# Altium PCB Copy of IoT_SYNTHPATCH.PcbDoc (part 1 of 2)
Units mm, origin at the board's own origin, x right, y up, seen from the top; angles counter-clockwise.
Board outline 99 x 108 mm, 4 copper layers (Top Layer, PWR, GND, Bottom Layer), stack 1.587 mm thick; 354 components, 216 nets, 1040 pads, 0 vias.
Unrouted connection lines stored in the file: 706.
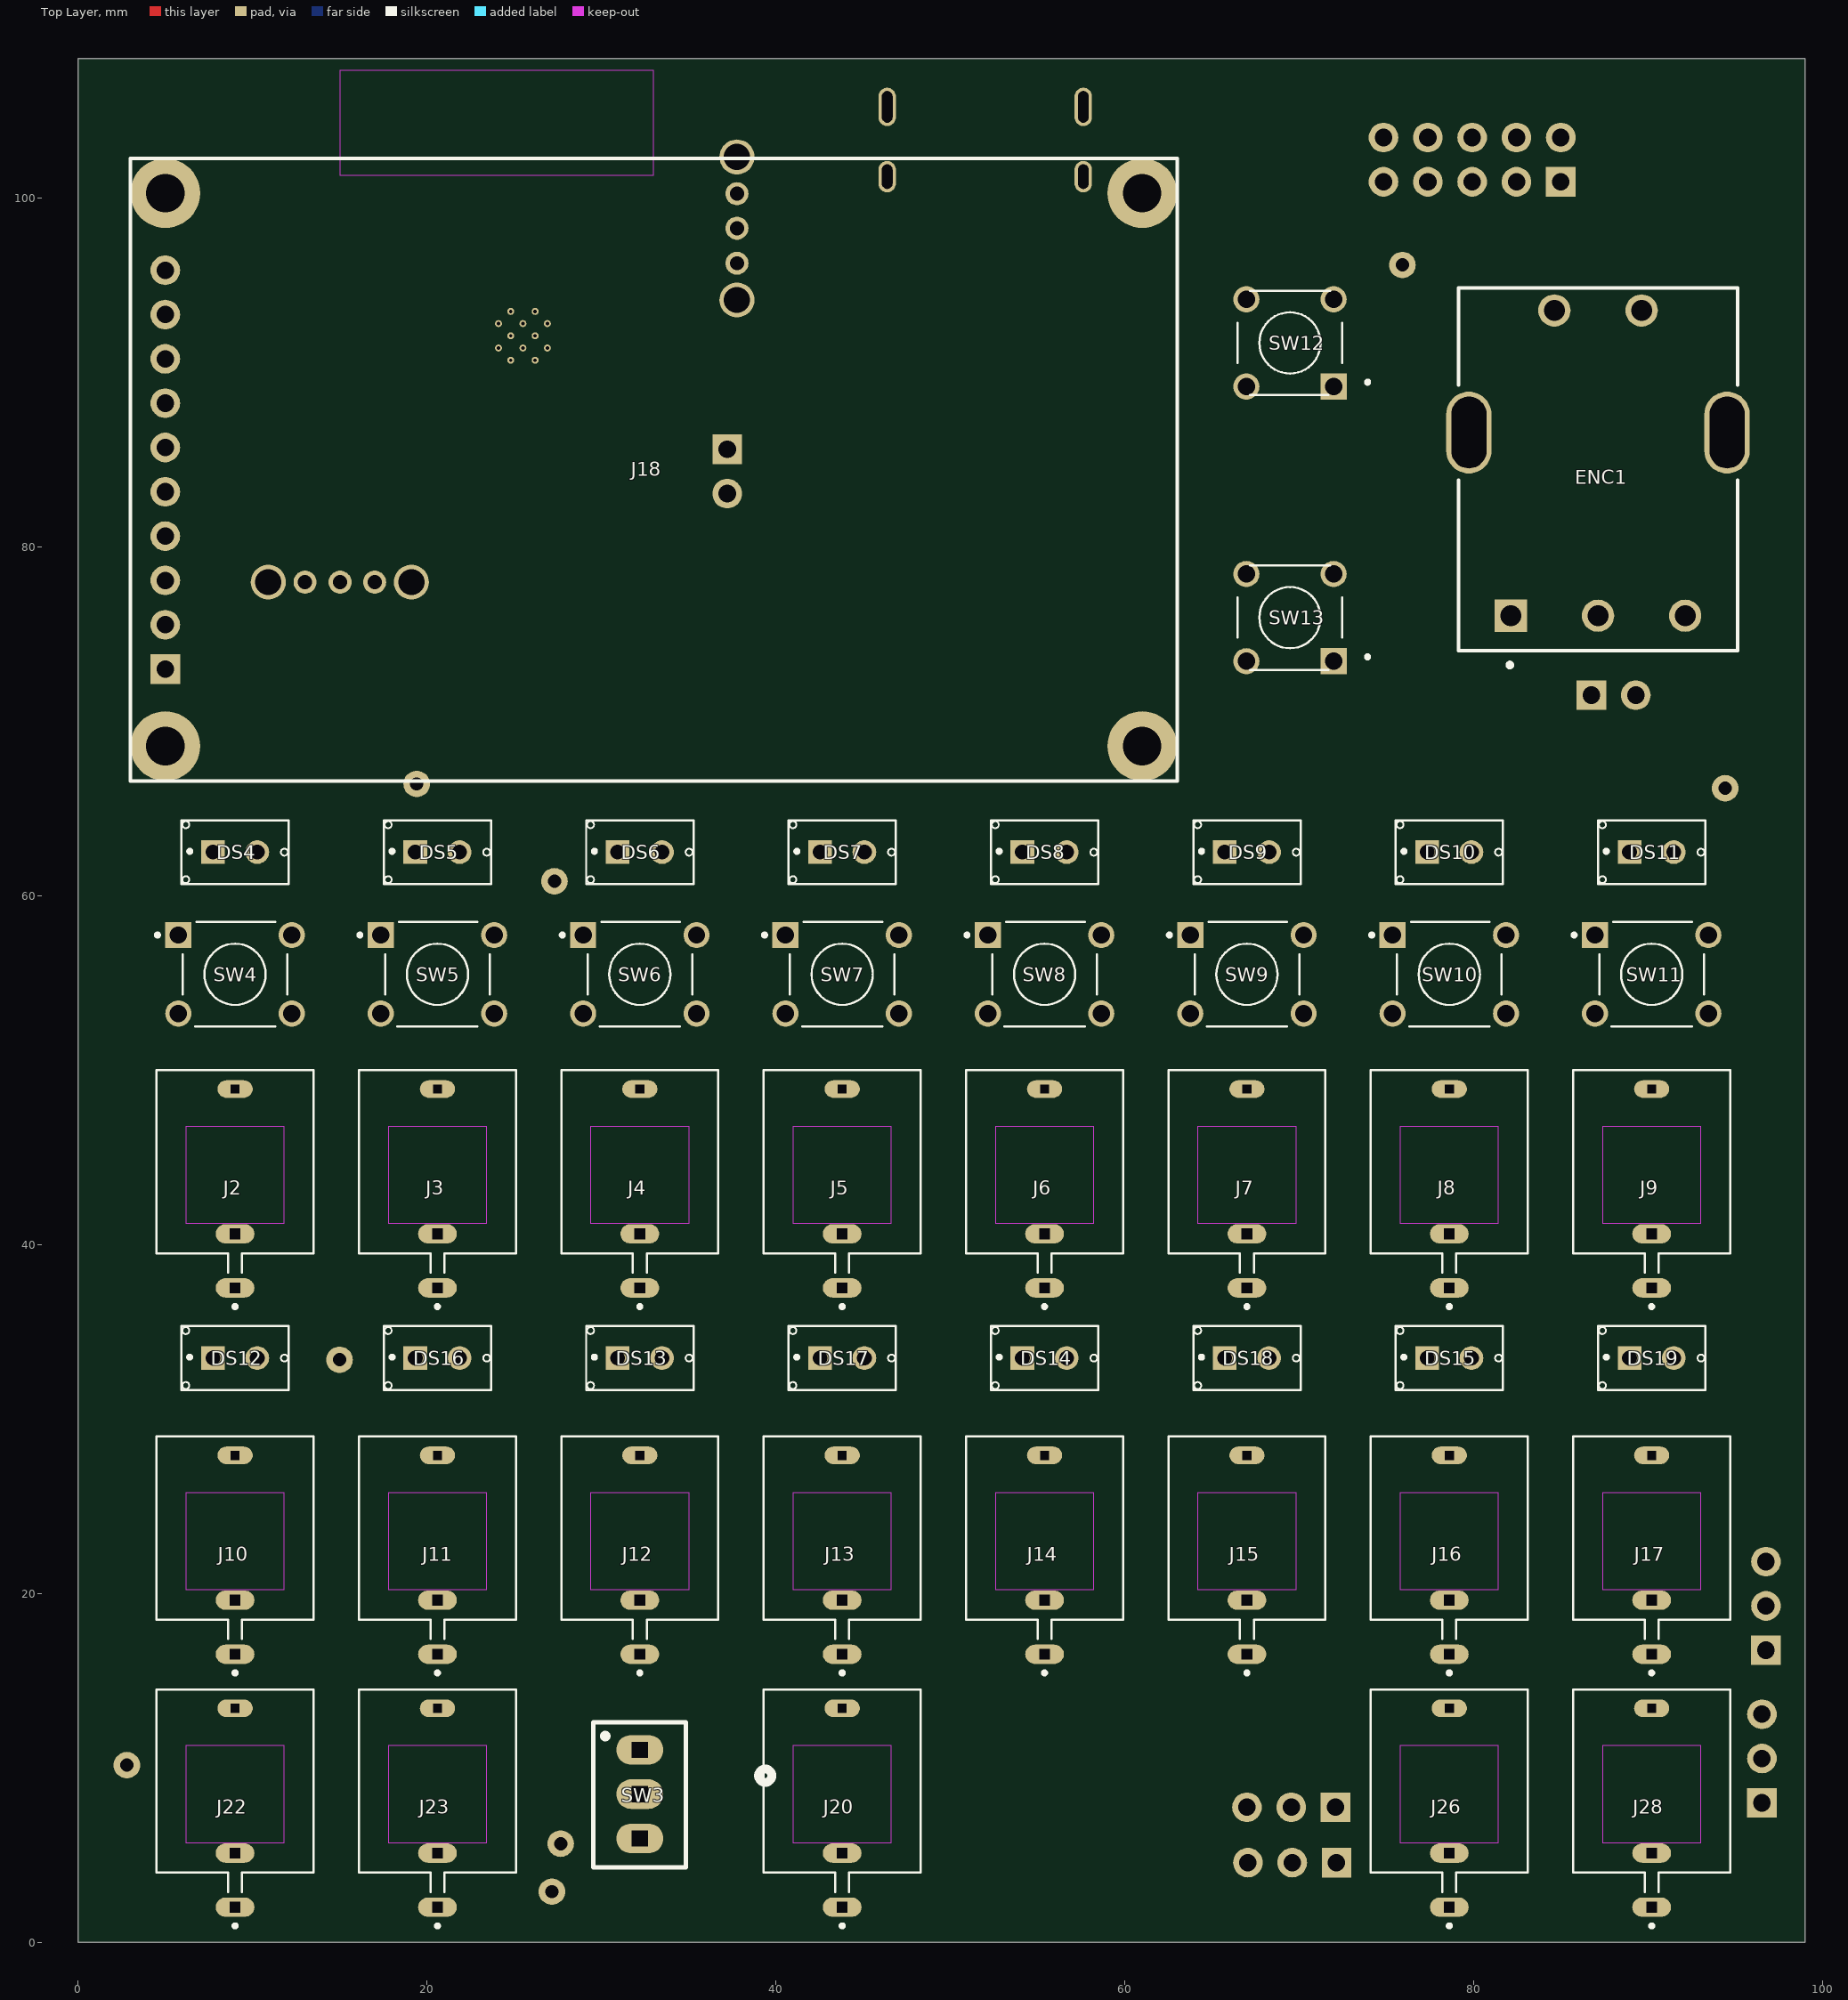
[diagram p0: Top Layer view]
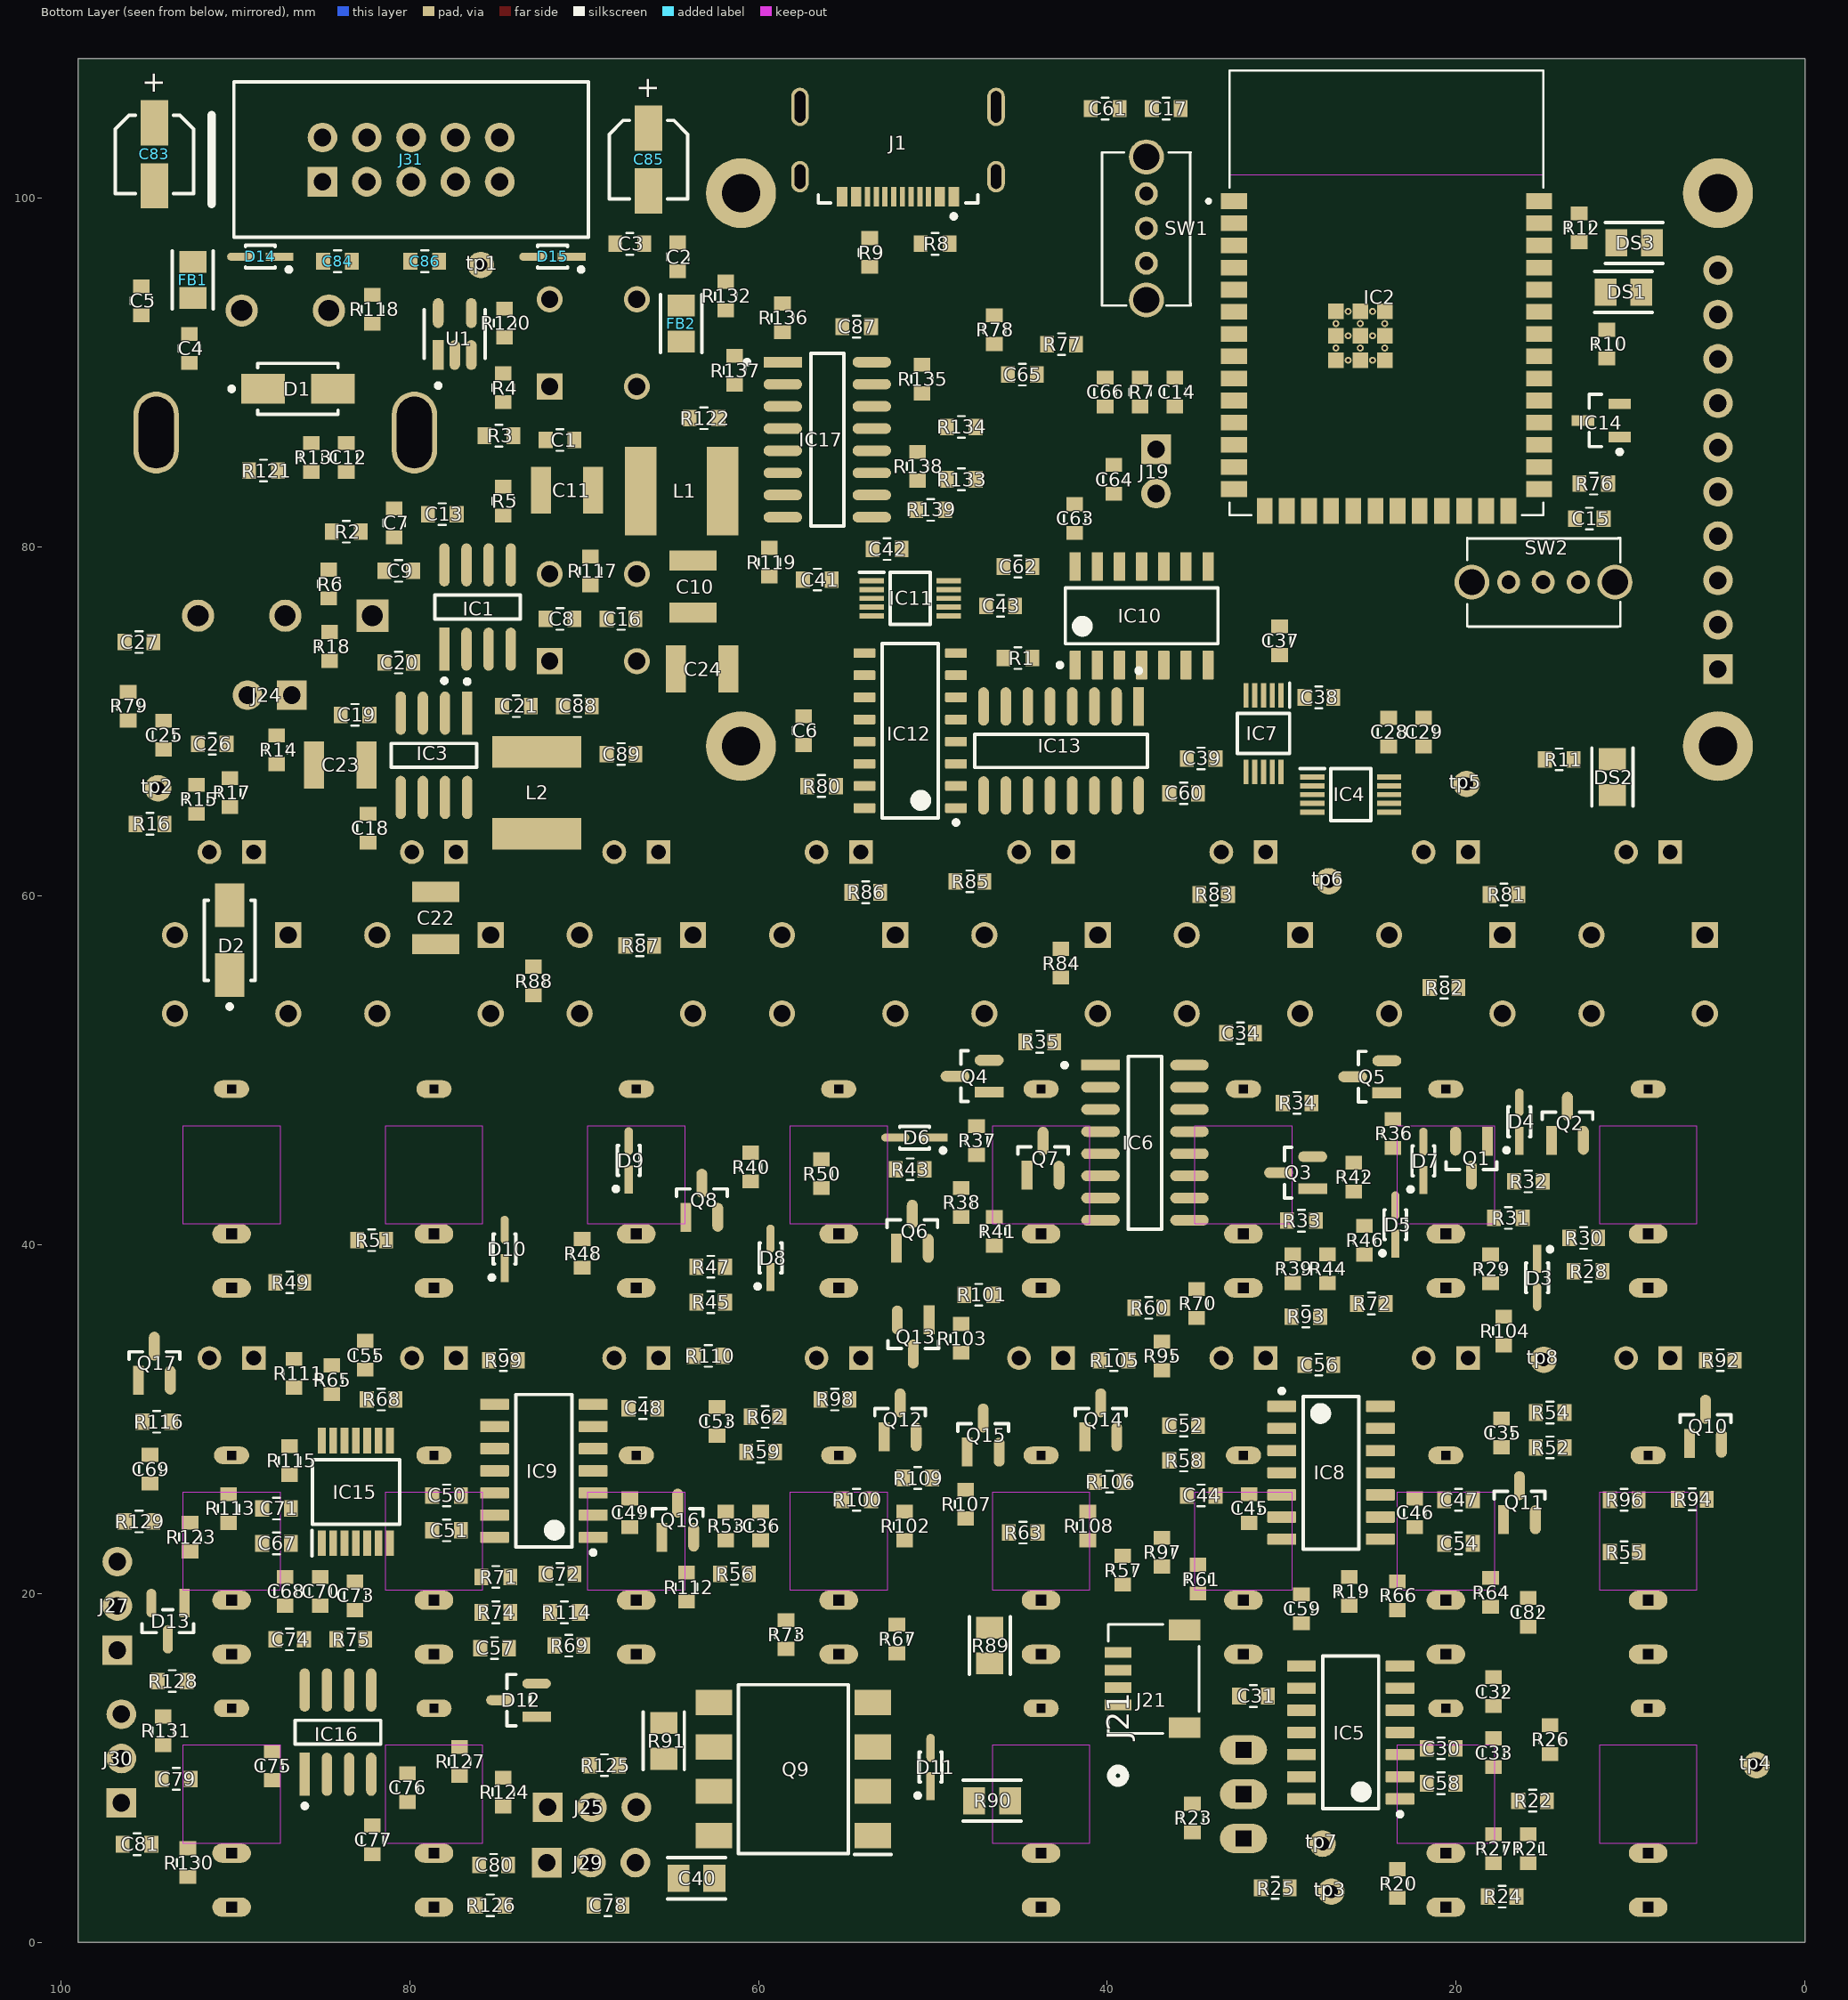
[diagram p1: Bottom Layer view, seen from below]
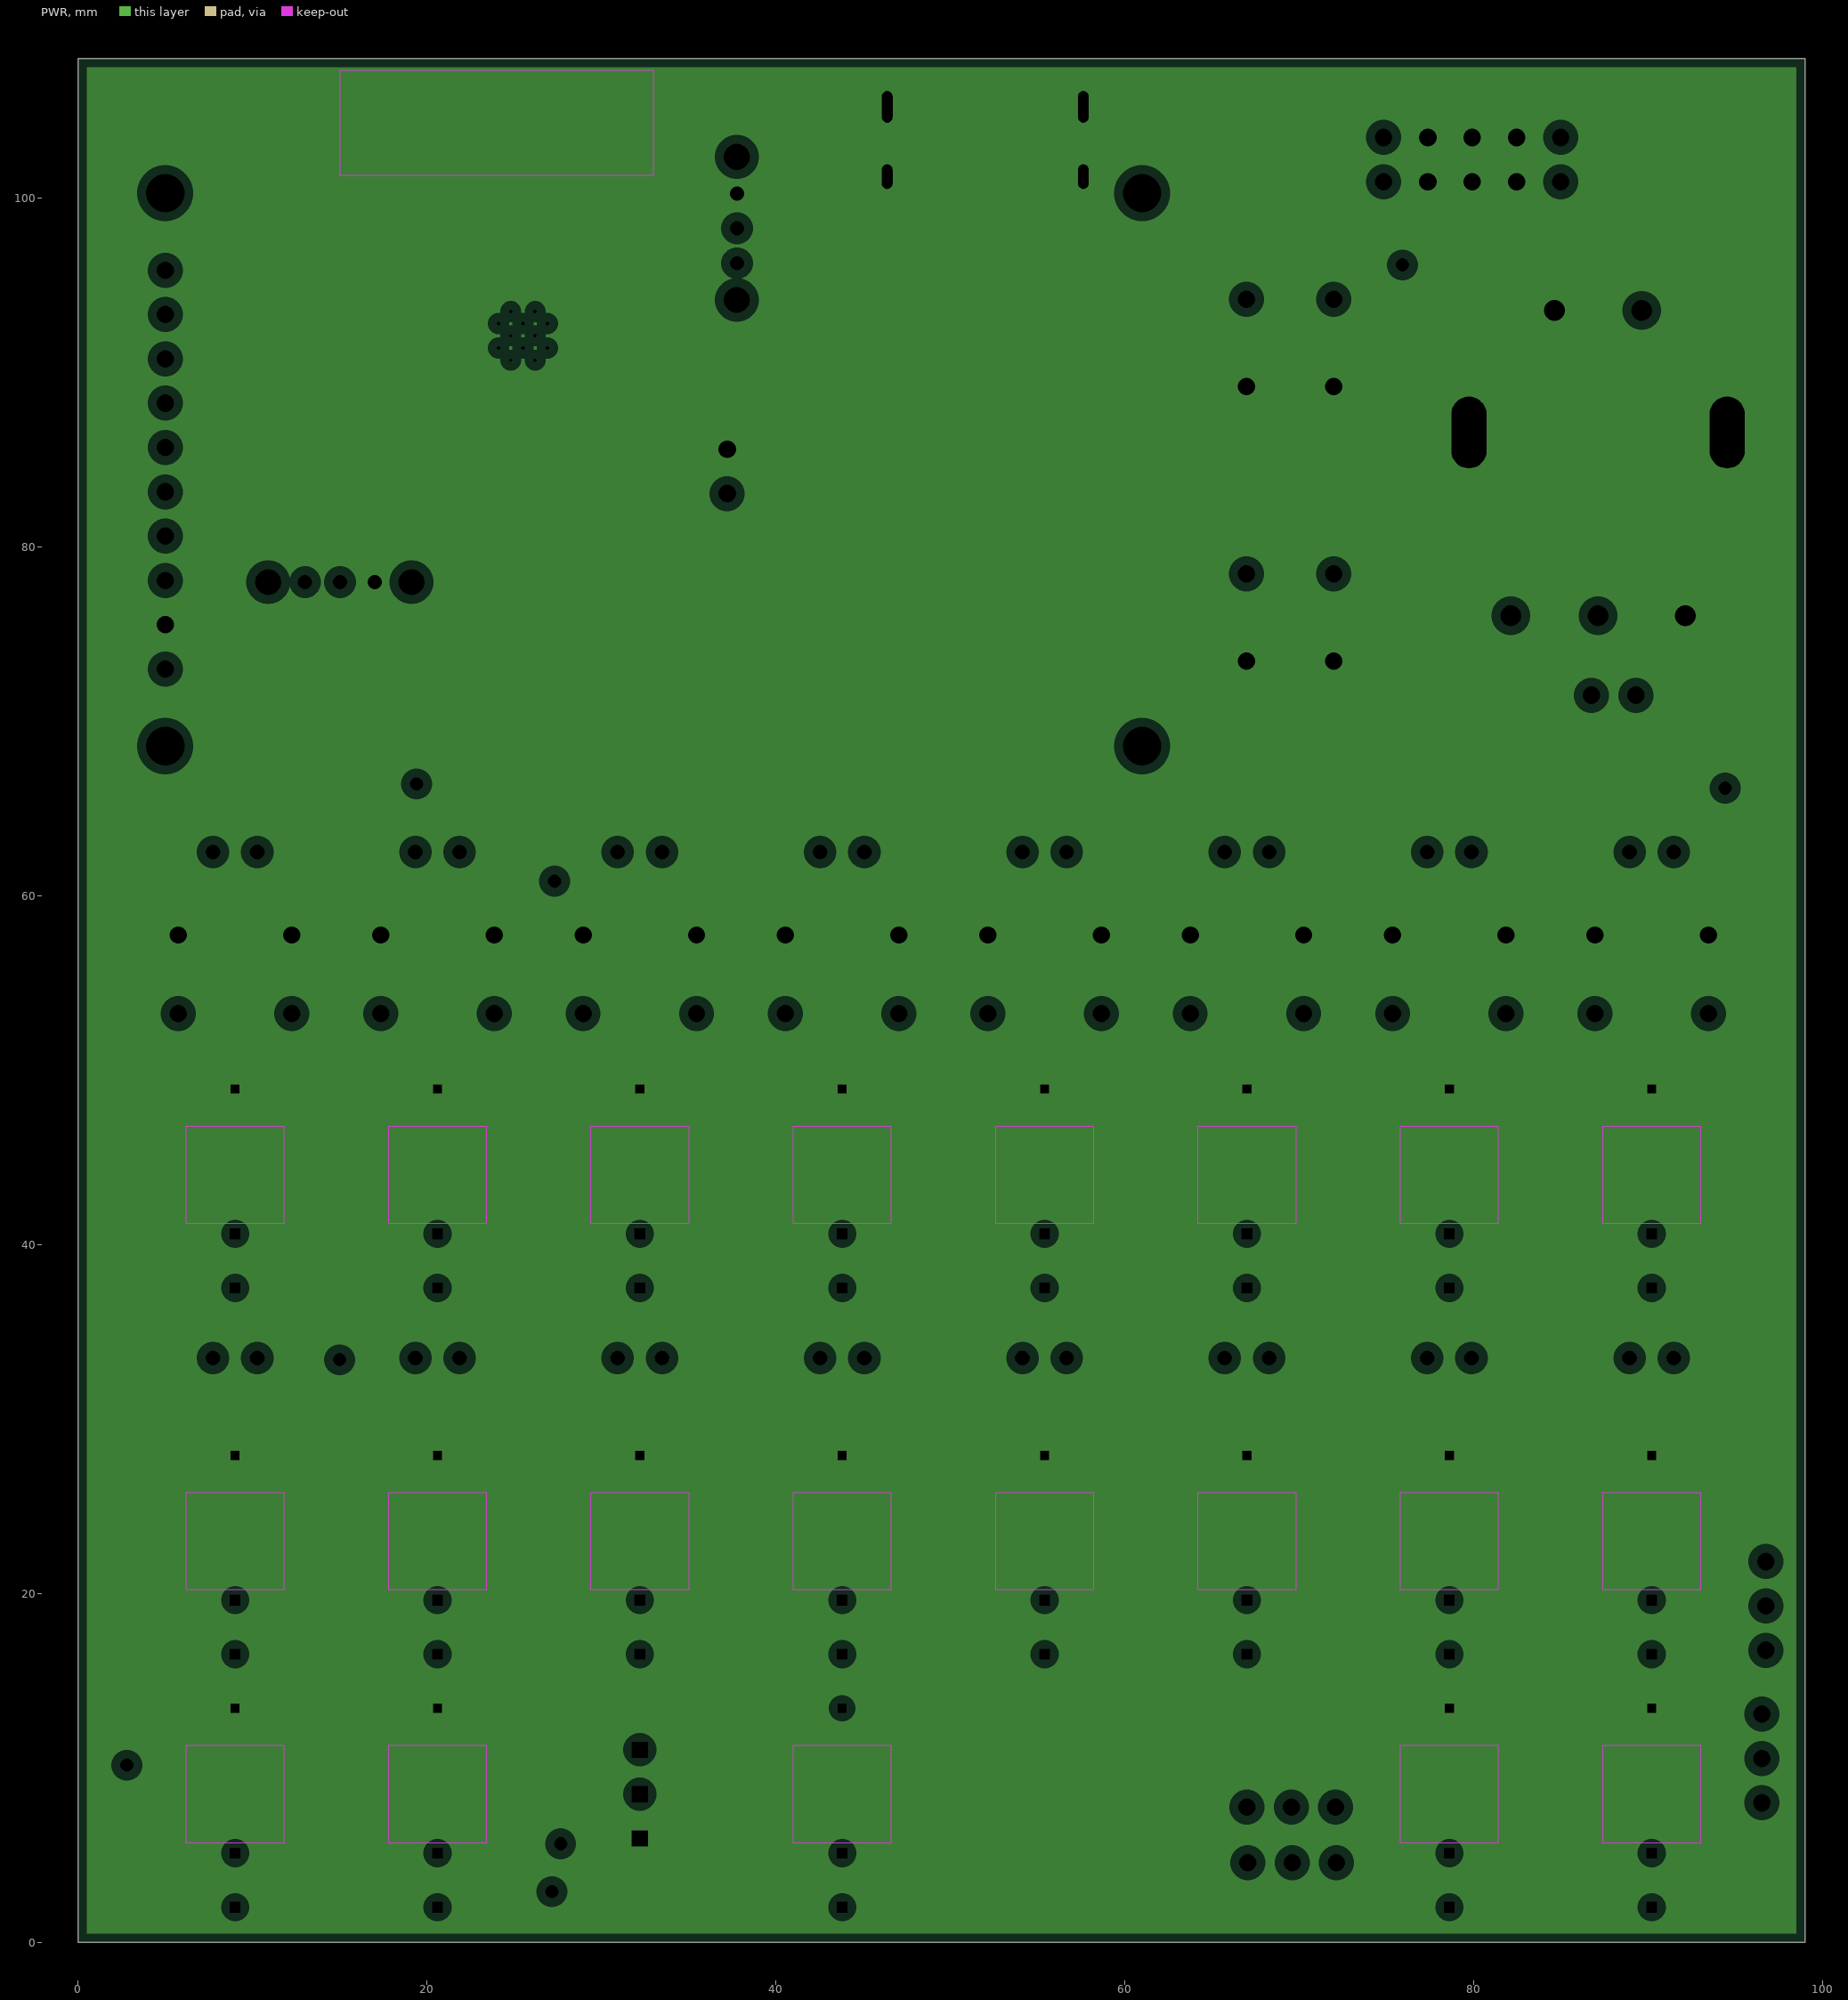
[diagram p2: PWR, clearances drawn from the general rule]
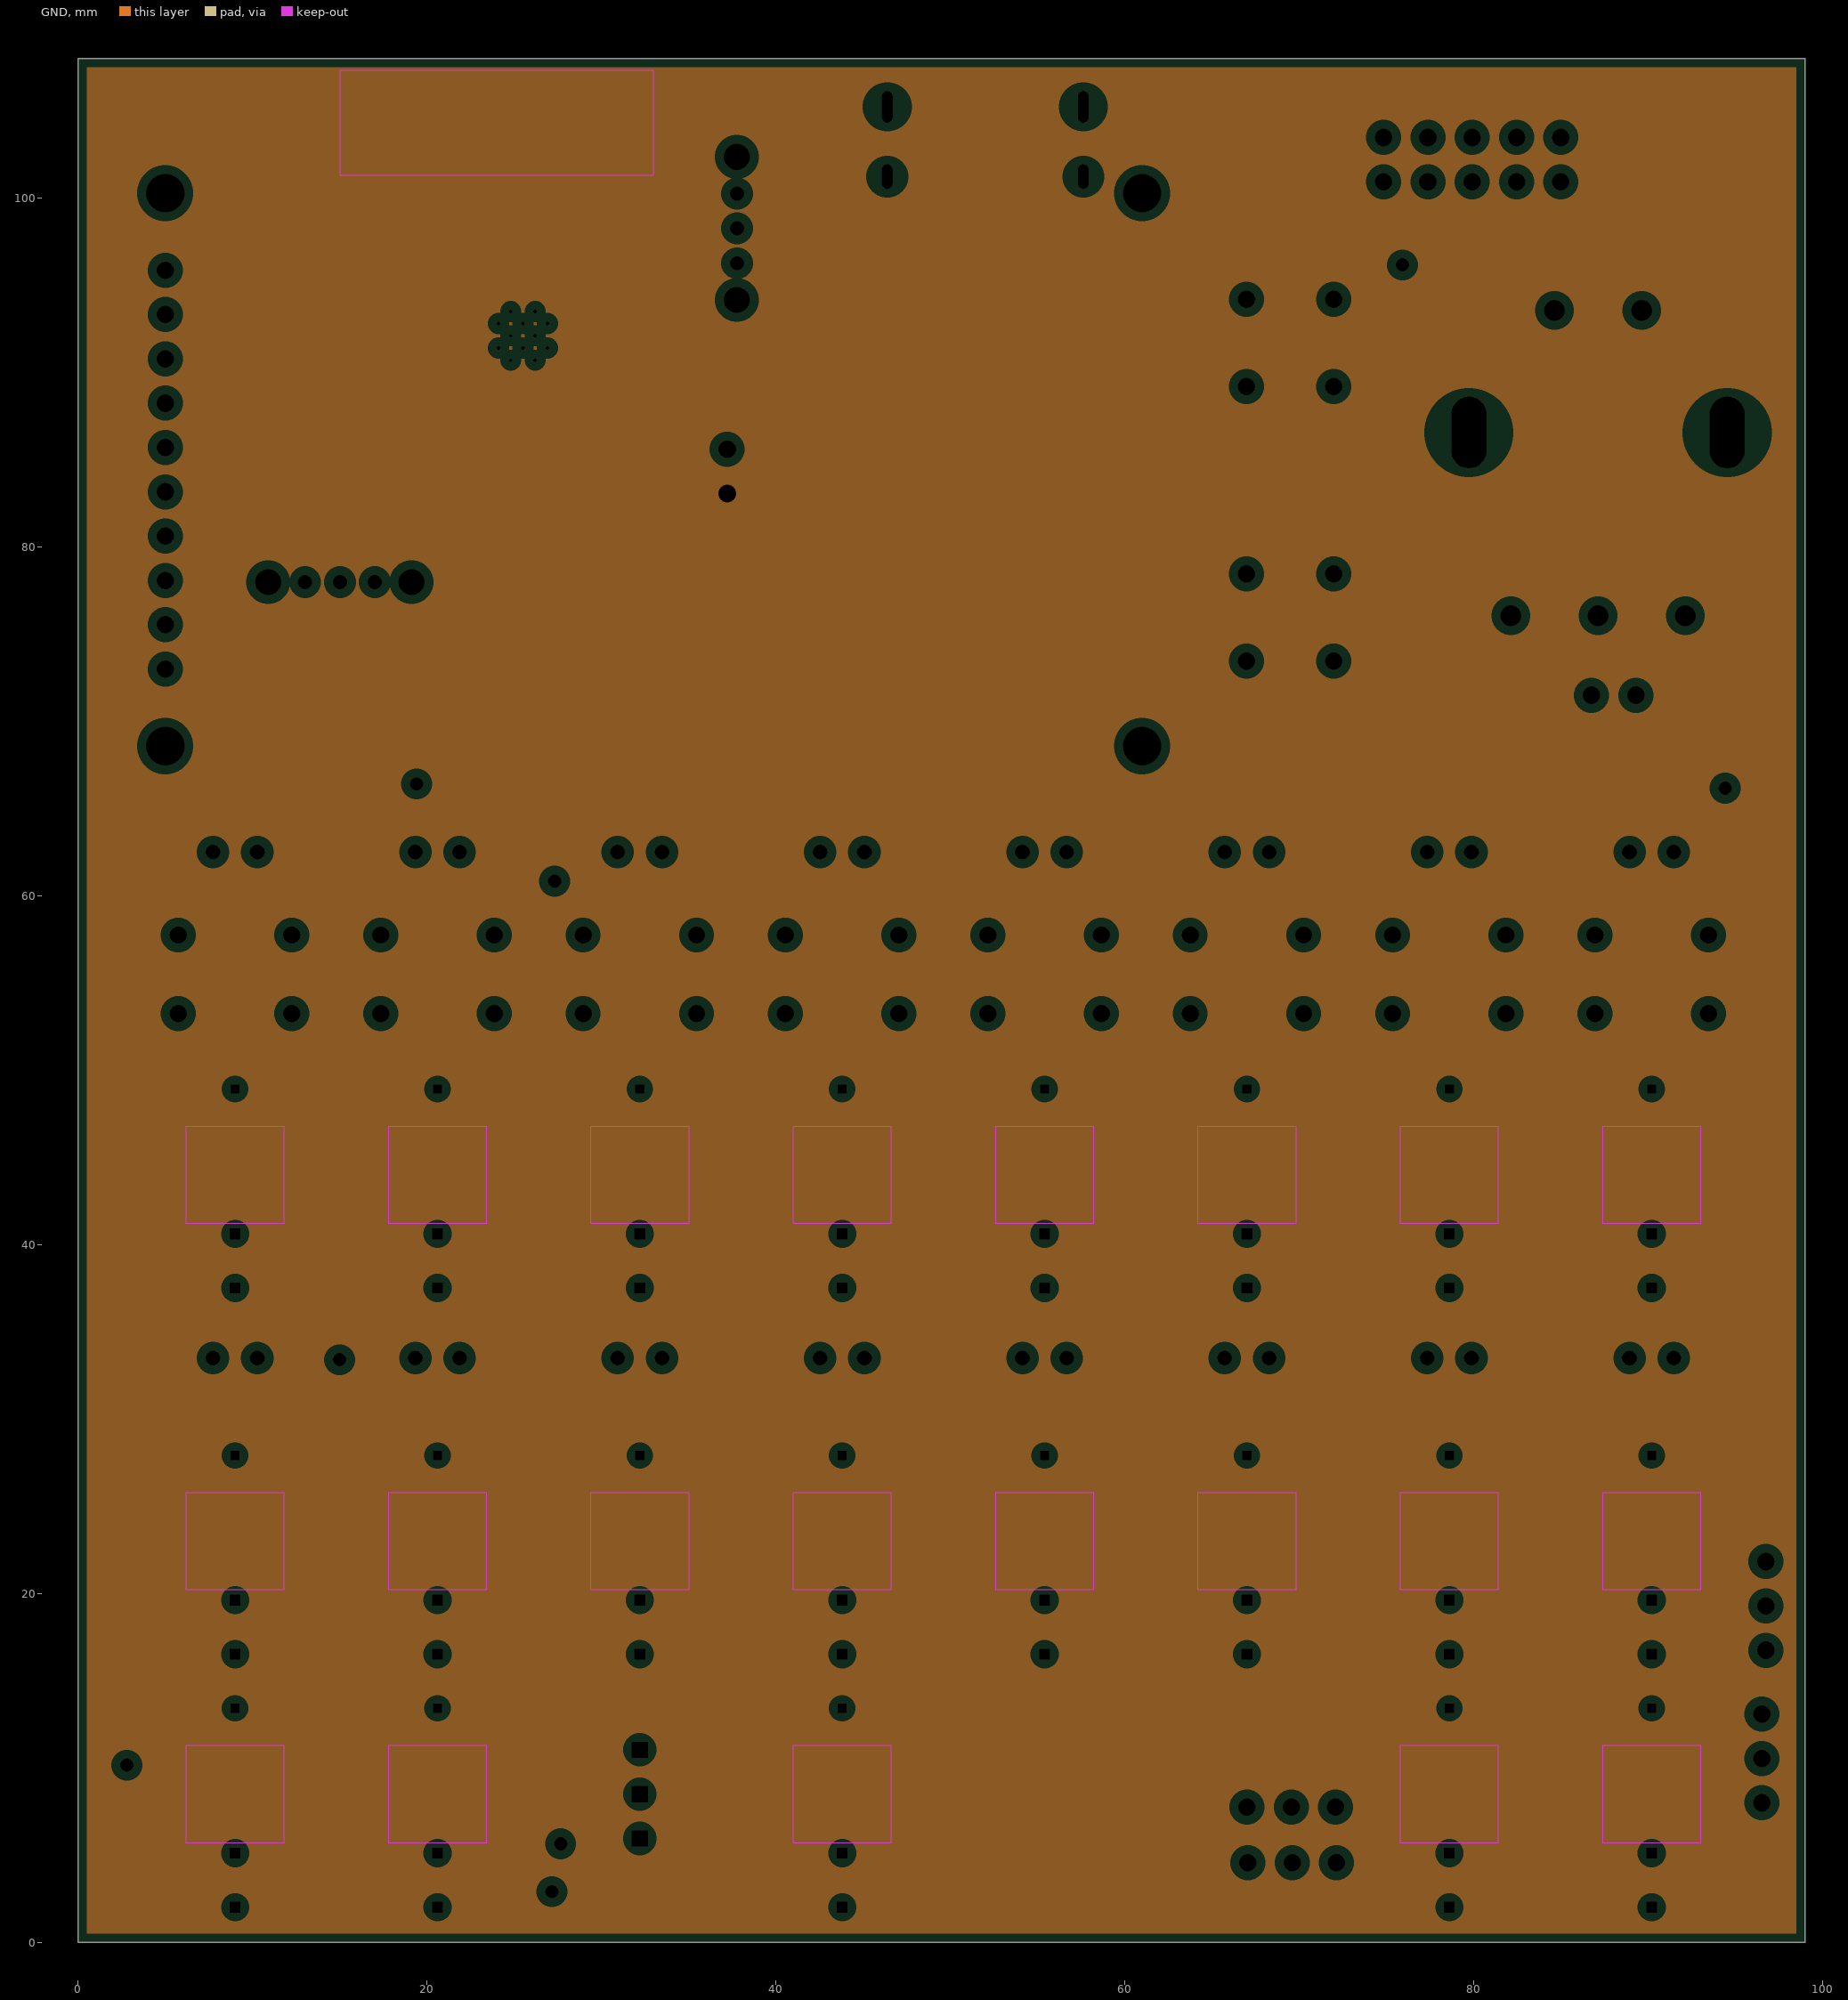
[diagram p3: GND, clearances drawn from the general rule]

## Layer stack, top to bottom
Top Solder: solder mask 0.0102, Solder Resist, Dk 3.5
Top Layer: signal copper 0.0356
Dielectric 2: prepreg 0.2104, PP-006, Dk 4.4
PWR: plane copper 0.0152, net GND
Dielectric 1: dielectric 1.065, FR-4, Dk 4.6
GND: plane copper 0.0152, net +3.3
Dielectric 3: prepreg 0.2104, PP-006, Dk 4.4
Bottom Layer: signal copper 0.0356
Bottom Solder: solder mask 0.0102, Solder Resist, Dk 3.5

## Board outline
0,0 0,108 99,108 99,0

## Design rules (kind name [scope] priority, off if disabled: settings)
Clearance [All] p1: gap=0.254 ignorepadtopadclearanceinfootprint=FALSE
DiffPairsRouting [All] p1: maxlimit=0.2 minlimit=0.16 mostfreqgap=0.18 toplayer_minwidth=0.28 toplayer_maxwidth=0.32 toplayer_prefwidth=0.3 bottomlayer_minwidth=0.28 bottomlayer_maxwidth=0.32 bottomlayer_prefwidth=0.3 maxuncoupledlength=12.7
PlaneClearance [All] p1: clearance=0.508
PlaneConnect [All] p1: planeconnectstyle=Relief reliefexpansion=0.508 reliefentries=4 reliefconductorwidth=0.254 reliefairgap=0.254
PolygonConnect [All] p1: connectstyle=Relief reliefconductorwidth=0.254 reliefentries=4 polygonreliefangle="90 Angle" airgapwidth=0.254
RoutingVias [All] p1: holewidth=0.711 width=1.27 viastyle="Through Hole" minholewidth=0.711 minwidth=1.27 maxholewidth=0.711 maxwidth=1.27
SolderMaskExpansion [All] p1: expansion=0 istentingtop=FALSE
SupplyNets "Schematic Supply Nets_6" [InNet('+5_USB')] p1: voltage=0.000
SupplyNets "Schematic Supply Nets_5" [InNet('+3.3')] p2: voltage=0.000
SupplyNets "Schematic Supply Nets_4" [InNet('GND')] p3: voltage=0.000
SupplyNets "Schematic Supply Nets_3" [InNet('+5')] p4: voltage=0.000
SupplyNets "Schematic Supply Nets_2" [InNet('-12')] p5: voltage=0.000
SupplyNets "Schematic Supply Nets_1" [InNet('VREF_5')] p6: voltage=0.000
SupplyNets "Schematic Supply Nets" [InNet('+12')] p7: voltage=0.000
Width Width_PWR_LV [InNetClass('PWR_LV')] p1: maxlimit=2 minlimit=0.3 preferedwidth=0.5 minimp=50.000000 maximp=50.000000 favimp=50.000000
Width Width_PWR_IN [InNetClass('PWR_IN')] p2: maxlimit=2 minlimit=0.4 preferedwidth=0.8 minimp=50.000000 maximp=50.000000 favimp=50.000000
Width [All] p3: maxlimit=0.254 minlimit=0.254 preferedwidth=0.254
27 further rules are at their usual default settings.

## Classes and differential pairs
net class PWR_LV: +3.3 +5 +5_USB GND
net class PWR_IN: +12 -12 NetC1_2 NetC7_2 NetC18_2 NetC83_2 NetC85_1
component class MENU_BUTTONS: C87 IC17 R132 R133 R134 R135 R136 R137 R138 R139 SW12 SW13
component class POWER_CONNECTOR: C83 C84 C85 C86 D14 D15 FB1 FB2 J31
component class POWER: C1 C2 C3 C4 C5 C6 C7 C8 C9 C10 C11 C12 C13 C16 C18 C19 C20 C21 C22 C23 C24 C25 C26 C27 D1 D2 IC1 IC3 J19 J24 L1 L2 R2 R3 R4 R5 R6 R13 R14 R15 R16 R17 R18 R79 tp1 tp2 U1
component class MUTE_BUTTONS: C60 DS4 DS5 DS6 DS7 DS8 DS9 DS10 DS11 IC12 IC13 R1 R80 R81 R82 R83 R84 R85 R86 R87 R88 SW4 SW5 SW6 SW7 SW8 SW9 SW10 SW11
component class MIDI: C40 D11 J20 J21 Q9 R89 R90 R91
component class Main: C14 C15 C17 C61 DS1 DS2 DS3 IC2 J1 R7 R8 R9 R10 R11 R12 R76 R77 R78 SW1 SW2
component class INPUTS_GATES: C34 D3 D4 D5 D6 D7 D8 D9 D10 IC6 J2 J3 J4 J5 J6 J7 J8 J9 Q1 Q2 Q3 Q4 Q5 Q6 Q7 Q8 R28 R29 R30 R31 R32 R33 R34 R35 R36 R37 R38 R39 R40 R41 R42 R43 R44 R45 R46 R47 R48 R49 R50 R51
component class DISPLAY: C64 C65 C66 C88 C89 ENC1 J18 R117 R118 R119 R120 R121 R122
component class DAC_VOCT: C28 C29 C30 C31 C32 C33 C58 C59 C62 C63 C82 IC4 IC5 IC10 J22 J23 R19 R20 R21 R22 R23 R24 R25 R26 R27 SW3 tp3 tp4 tp5 tp6 tp7 tp8
component class DAC_LFO: C35 C36 C37 C38 C39 C41 C42 C43 C44 C45 C46 C47 C48 C49 C50 C51 C52 C53 C54 C55 C56 C57 DS12 DS13 DS14 DS15 DS16 DS17 DS18 DS19 IC7 IC8 IC9 IC11 IC14 J10 J11 J12 J13 J14 J15 J16 J17 Q10 Q11 Q12 Q13 Q14 Q15 Q16 Q17 R52 R53 R54 R55 R56 R57 R58 R59 R60 R61 R62 R63 R64 R65 R66 R67 R68 R69 R70 R71 R72 R73 R74 R75 R92 R93 R94 R95 R96 R97 R98 R99 R100 R101 R102 R103 R104 R105 R106 R107 R108 R109 R110 R111 R112 R113 R114 R115 R116
component class ADC: C67 C68 C69 C70 C71 C72 C73 C74 C75 C76 C77 C78 C79 C80 C81 D12 D13 IC15 IC16 J25 J26 J27 J28 J29 J30 R123 R124 R125 R126 R127 R128 R129 R130 R131
differential pair D: +D_P -D_N

## Components (designator, comment, footprint, x,y, rotation, side; value= is the part's Value field where it differs from the comment)
C1 "0.1uF" CAPC2013X145X48NL20T23 71.375,86.125 r0 bottom
C2 "1uF" CAPC2013X145X48NL20T23 64.625,96.625 r90 bottom
C3 "10uF" CAPC2013X145X48NL20T23 67.375,97.375 r180 bottom
C4 "1uF" CAPC2013X145X48NL20T23 92.625,91.375 r270 bottom
C5 "10uF" CAPC2013X145X48NL20T23 95.377,94.107 r90 bottom
C6 "0.1uF" CAPC2013X145X48NL20T23 57.404,69.469 r90 bottom
C7 "4.7uF" CAPC2013X145X48NL20T23 80.875,81.375 r270 bottom
C8 "4.7uF" CAPC2013X145X48NL20T23 71.375,75.875 r0 bottom
C9 "0.01uF" CAPC2013X145X48NL20T23 80.625,78.625 r180 bottom
C10 "47uF" CAP_1210 63.75,77.725 r90 bottom
C11 "47uF" CAP_1210 70.975,83.25 r180 bottom
C12 "1nF" CAPC2013X145X48NL20T23 83.625,85.125 r270 bottom
C13 "47pF" CAPC2013X145X48NL20T23 78.125,81.875 r0 bottom
C14 "1uF" CAPC2013X145X48NL20T23 36.125,88.875 r270 bottom
C15 "0.1uF" CAPC2013X145X48NL20T23 12.375,81.625 r0 bottom
C16 "0.01uF" CAPC2013X145X48NL20T23 67.875,75.875 r0 bottom
C17 "0.1uF" CAPC2013X145X48NL20T23 36.625,105.125 r180 bottom
C18 "0.1uF" CAPC2013X145X48NL20T23 82.375,63.875 r90 bottom
C19 "4.7uF" CAPC2013X145X48NL20T23 83.125,70.375 r180 bottom
C20 "4.7uF" CAPC2013X145X48NL20T23 80.625,73.375 r180 bottom
C21 "0.01uF" CAPC2013X145X48NL20T23 73.875,70.875 r0 bottom
C22 "47uF" CAP_1210 78.5,58.725 r90 bottom
C23 "47uF" CAP_1210 83.975,67.5 r180 bottom
C24 "47uF" CAP_1210 63.225,73 r0 bottom
C25 "1nF" CAPC2013X145X48NL20T23 94.107,69.215 r270 bottom
C26 "47pF" CAPC2013X145X48NL20T23 91.313,68.707 r0 bottom
C27 "0.01uF" CAPC2013X145X48NL20T23 95.504,74.549 r180 bottom
C28 "0.1uF" CAPC2013X145X48NL20T23 23.875,69.375 r270 bottom
C29 "10uF" CAPC2013X145X48NL20T23 21.875,69.375 r270 bottom
C30 "0.1uF" CAPC2013X145X48NL20T23 20.875,11.125 r0 bottom
C31 "0.1uF" CAPC2013X145X48NL20T23 31.625,14.125 r0 bottom
C32 "100pF" CAPC2013X145X48NL20T23 17.875,14.375 r90 bottom
C33 "100pF" CAPC2013X145X48NL20T23 17.875,10.875 r90 bottom
C34 "0.1uF" CAPC2013X145X48NL20T23 32.375,52.125 r180 bottom
C35 "100pF" CAPC2013X145X48NL20T23 17.399,29.21 r90 bottom
C36 "100pF" CAPC2013X145X48NL20T23 59.875,23.875 r90 bottom
C37 "10uF" CAPC2013X145X48NL20T23 30.125,74.625 r270 bottom
C38 "0.1uF" CAPC2013X145X48NL20T23 27.875,71.375 r0 bottom
C39 "0.1uF" CAPC2013X145X48NL20T23 34.625,67.875 r180 bottom
C40 "0.1uF" 0805-hs 63.553,3.678 r180 bottom
C41 "10uF" CAPC2013X145X48NL20T23 56.625,78.125 r180 bottom
C42 "0.1uF" CAPC2013X145X48NL20T23 52.625,79.875 r0 bottom
C43 "0.1uF" CAPC2013X145X48NL20T23 46.125,76.625 r0 bottom
C44 "10uF" CAPC2013X145X48NL20T23 34.625,25.625 r0 bottom
C45 "0.1uF" CAPC2013X145X48NL20T23 31.875,24.875 r270 bottom
C46 "0.1uF" CAPC2013X145X48NL20T23 22.375,24.625 r270 bottom
C47 "10uF" CAPC2013X145X48NL20T23 19.875,25.375 r180 bottom
C48 "10uF" CAPC2013X145X48NL20T23 66.625,30.625 r180 bottom
C49 "0.1uF" CAPC2013X145X48NL20T23 67.375,24.625 r270 bottom
C50 "0.1uF" CAPC2013X145X48NL20T23 77.875,25.625 r0 bottom
C51 "10uF" CAPC2013X145X48NL20T23 77.875,23.625 r0 bottom
C52 "100pF" CAPC2013X145X48NL20T23 35.625,29.625 r0 bottom
C53 "100pF" CAPC2013X145X48NL20T23 62.375,29.875 r90 bottom
C54 "100pF" CAPC2013X145X48NL20T23 19.875,22.875 r0 bottom
C55 "100pF" CAPC2013X145X48NL20T23 82.55,33.655 r270 bottom
C56 "100pF" CAPC2013X145X48NL20T23 27.875,33.125 r0 bottom
C57 "100pF" CAPC2013X145X48NL20T23 75.125,16.875 r180 bottom
C58 "10uF" CAPC2013X145X48NL20T23 20.875,9.125 r0 bottom
C59 "10uF" CAPC2013X145X48NL20T23 28.875,19.125 r270 bottom
C60 "0.1uF" CAPC2013X145X48NL20T23 35.625,65.875 r180 bottom
C61 "10uF" CAPC2013X145X48NL20T23 40.125,105.125 r180 bottom
C62 "10uF" CAPC2013X145X48NL20T23 45.125,78.875 r180 bottom
C63 "0.1uF" CAPC2013X145X48NL20T23 41.875,81.625 r270 bottom
C64 "10nF" CAPC2013X145X48NL20T23 39.625,83.875 r90 bottom
C65 "0.1uF" CAPC2013X145X48NL20T23 44.875,89.875 r0 bottom
C66 "10nF" CAPC2013X145X48NL20T23 40.125,88.875 r90 bottom
C67 "0.1uF" CAPC2013X145X48NL20T23 87.625,22.875 r180 bottom
C68 "10uF" CAPC2013X145X48NL20T23 87.125,20.125 r90 bottom
C69 "1uF" CAPC2013X145X48NL20T23 94.875,27.125 r90 bottom
C70 "0.1uF" CAPC2013X145X48NL20T23 85.125,20.125 r90 bottom
C71 "10uF" CAPC2013X145X48NL20T23 87.625,24.875 r180 bottom
C72 "1uF" CAPC2013X145X48NL20T23 71.375,21.125 r0 bottom
C73 "0.1uF" CAPC2013X145X48NL20T23 83.125,19.875 r90 bottom
C74 "0.1uF" CAPC2013X145X48NL20T23 86.875,17.375 r0 bottom
C75 "10uF" CAPC2013X145X48NL20T23 87.875,10.125 r270 bottom
C76 "0.1uF" CAPC2013X145X48NL20T23 80.125,8.875 r270 bottom
C77 "10uF" CAPC2013X145X48NL20T23 82.125,5.875 r270 bottom
C78 "270pF" CAPC2013X145X48NL20T23 68.625,2.125 r180 bottom
C79 "270pF" CAPC2013X145X48NL20T23 93.375,9.375 r0 bottom
C80 "68pF" CAPC2013X145X48NL20T23 75.184,4.445 r180 bottom
C81 "68pF" CAPC2013X145X48NL20T23 95.625,5.625 r0 bottom
C82 "0.15uF" CAPC2013X145X48NL20T23 15.875,18.923 r270 bottom
C83 "47uF" WCAP-ASLI_D4H5.5 94.625,102.5 r90 bottom
C84 "0.1uF" CAPC2013X145X48NL20T23 84.125,96.375 r0 bottom
C85 "47uF" WCAP-ASLI_D4H5.5 66.3,102.2 r90 bottom
C86 "0.1uF" CAPC2013X145X48NL20T23 79.125,96.375 r0 bottom
C87 "0.1uF" CAPC2013X145X48NL20T23 54.375,92.625 r0 bottom
C88 "0.1uF" CAPC2013X145X48NL20T23 70.375,70.875 r0 bottom
C89 "10uF" CAPC2013X145X48NL20T23 67.875,68.125 r0 bottom
D1 "B340A-13-F" FP-SMA-MFG 86.4,89.06 r180 bottom
D2 "B340A-13-F" FP-SMA-MFG 90.31,57.45 r90 bottom
D3 "1N4148WS" 4148 15.367,38.1 r270 bottom
D4 "1N4148WS" 4148 16.386,47.053 r90 bottom
D5 "1N4148WS" 4148 23.495,41.148 r90 bottom
D6 "1N4148WS" 4148 51.053,46.136 r0 bottom
D7 "1N4148WS" 4148 21.886,44.803 r90 bottom
D8 "1N4148WS" 4148 59.309,39.243 r90 bottom
D9 "1N4148WS" 4148 67.437,44.831 r90 bottom
D10 "1N4148WS" 4148 74.549,39.751 r90 bottom
D11 "1N4148WS" 4148 50.136,10.053 r90 bottom
D12 "BAT54S-E3-08" FP-6_541-5014_01-4-IPC_A 73.755,13.886 r0 bottom value=10pF
D13 "BAT54S-E3-08" FP-6_541-5014_01-4-IPC_A 93.853,18.415 r270 bottom value=10pF
D14 "1N4148WS" 4148 88.553,96.636 r0 bottom
D15 "1N4148WS" 4148 71.803,96.636 r0 bottom
DS1 "LED" LED_0805 10.414,94.615 r180 bottom
DS2 "LED" LED_0805 11.049,66.802 r270 bottom
DS3 "LED" LED_0805 9.803,97.428 r180 bottom
DS4 "LED" LED_SSL-LX4673GD-LA20 9,62.5 r0 top
DS5 "LED" LED_SSL-LX4673GD-LA20 20.6,62.5 r0 top
DS6 "LED" LED_SSL-LX4673GD-LA20 32.2,62.5 r0 top
DS7 "LED" LED_SSL-LX4673GD-LA20 43.8,62.5 r0 top
DS8 "LED" LED_SSL-LX4673GD-LA20 55.4,62.5 r0 top
DS9 "LED" LED_SSL-LX4673GD-LA20 67,62.5 r0 top
DS10 "LED" LED_SSL-LX4673GD-LA20 78.6,62.5 r0 top
DS11 "LED" LED_SSL-LX4673GD-LA20 90.2,62.5 r0 top
DS12 "LED" LED_SSL-LX4673GD-LA20 9,33.5 r0 top
DS13 "LED" LED_SSL-LX4673GD-LA20 32.2,33.5 r0 top
DS14 "LED" LED_SSL-LX4673GD-LA20 55.4,33.5 r0 top
DS15 "LED" LED_SSL-LX4673GD-LA20 78.6,33.5 r0 top
DS16 "LED" LED_SSL-LX4673GD-LA20 20.6,33.5 r0 top
DS17 "LED" LED_SSL-LX4673GD-LA20 43.8,33.5 r0 top
DS18 "LED" LED_SSL-LX4673GD-LA20 67,33.5 r0 top
DS19 "LED" LED_SSL-LX4673GD-LA20 90.2,33.5 r0 top
ENC1 "PEC16-4115F-S0012" FP-PEC16-4115F-S0012-MFG 87.122,84.455 r0 top
FB1 "BLM21PG600BH1D" 0805-hs 92.428,95.303 r90 bottom
FB2 "BLM21PG600BH1D" 0805-hs 64.428,92.803 r90 bottom
IC1 "TPS54331DG4" D8_N 76.101,76.553 r90 bottom
IC2 "ESP32-S3-WROOM-1-N16R2" XCVR_ESP32-S3-WROOM-1-N16R2 24,94.562 r180 bottom
IC3 "TPS54331DG4" D8_N 78.601,68.053 r270 bottom
IC4 "DAC8562SDGSR" SOP50P490X110-10N 26.05,65.8 r180 bottom
IC5 "TL074CDRG4" tl074 26.05,12.035 r0 bottom
IC6 "74HC165D,653" FP-SOT109-1-MFG 37.846,45.847 r180 bottom
IC7 "DAC124S085CIMM_NOPB" SOP50P490X110-10N 31.05,69.3 r270 bottom
IC8 "TL074CDRG4" tl074 27.178,26.924 r180 bottom
IC9 "TL074CDRG4" tl074 72.3,27.035 r0 bottom
IC10 "SN74HCT125DR" FP-D0014A-IPC_B 38.035,76.05 r90 bottom
IC11 "DAC124S085CIMM_NOPB" SOP50P490X110-10N 51.3,77.05 r180 bottom
IC12 "TLC5916QDRQ1" D0016A_N 51.3,69.47 r0 bottom
IC13 "74HC165D,653" FP-SOT109-1-MFG 42.649,68.303 r270 bottom
IC14 "LM4040CEM3-5.0/NOPB" MF03A_L 11.684,87.249 r0 bottom
IC15 "PCM1808PW" SOP65P640X120-14N 83.075,25.826 r90 bottom
IC16 "TL072ACDRE4" tl072 84.101,12.053 r90 bottom
IC17 "74HC165D,653" FP-SOT109-1-MFG 56.053,86.149 r180 bottom
J1 "216990-0002" FP-216990-0002-MFG 52,104.076 r0 bottom
J2 "PJ398SM-12" THONK_PJ398SM-12 9,44 r0 top
J3 "PJ398SM-12" THONK_PJ398SM-12 20.6,44 r0 top
J4 "PJ398SM-12" THONK_PJ398SM-12 32.2,44 r0 top
J5 "PJ398SM-12" THONK_PJ398SM-12 43.8,44 r0 top
J6 "PJ398SM-12" THONK_PJ398SM-12 55.4,44 r0 top
J7 "PJ398SM-12" THONK_PJ398SM-12 67,44 r0 top
J8 "PJ398SM-12" THONK_PJ398SM-12 78.6,44 r0 top
J9 "PJ398SM-12" THONK_PJ398SM-12 90.2,44 r0 top
J10 "PJ398SM-12" THONK_PJ398SM-12 9,23 r0 top
J11 "PJ398SM-12" THONK_PJ398SM-12 20.6,23 r0 top
J12 "PJ398SM-12" THONK_PJ398SM-12 32.2,23 r0 top
J13 "PJ398SM-12" THONK_PJ398SM-12 43.8,23 r0 top
J14 "PJ398SM-12" THONK_PJ398SM-12 55.4,23 r0 top
J15 "PJ398SM-12" THONK_PJ398SM-12 67,23 r0 top
J16 "PJ398SM-12" THONK_PJ398SM-12 78.6,23 r0 top
J17 "PJ398SM-12" THONK_PJ398SM-12 90.2,23 r0 top
J18 "TFT" DFR0664_TFT_1x10_P2.54_M2 5,73 r90 top
J19 "Pinheader_1x2" HDR_1x2_P2.54 37.211,85.598 r270 bottom
J20 "PJ366ST" THONK_PJ366ST_MIDI_TRS 43.8,8.5 r0 top
J21 "4208" CONN_CCSH-W10R-04TR-BK-A_ADA 37.338,15.113 r90 bottom
J22 "PJ398SM-12" THONK_PJ398SM-12 9,8.5 r0 top
J23 "PJ398SM-12" THONK_PJ398SM-12 20.6,8.5 r0 top
J24 "Pinheader_1x2" HDR_1x2_P2.54 86.75,71.5 r0 bottom
J25 "Pinheader_1x3" HDR_1x3_P2.54 72.08,7.75 r180 bottom
J26 "PJ398SM-12" THONK_PJ398SM-12 78.6,8.5 r0 top
J27 "Pinheader_1x3" HDR_1x3_P2.54 96.75,16.75 r90 bottom
J28 "PJ398SM-12" THONK_PJ398SM-12 90.2,8.5 r0 top
J29 "Pinheader_1x3" HDR_1x3_P2.54 72.136,4.572 r180 bottom
J30 "Pinheader_1x3" HDR_1x3_P2.54 96.52,8.001 r90 bottom
J31 "Eurorack PWR 2x5" EURORACK_PWR_2x5_P2.54_SHROUDED 84.99,100.93 r180 bottom
L1 "6.8uH" IND_SRN6045 64.4,83.2 r0 bottom
L2 "6.8uH" IND_SRN6045 72.7,65.9 r90 bottom
Q1 "MMBT3904-7-F" 3904-SOT23 19.128,44.956 r270 bottom
Q2 "MMBT3904-7-F" 3904-SOT23 13.628,46.956 r90 bottom
Q3 "MMBT3904-7-F" 3904-SOT23 29.206,44.128 r0 bottom
Q4 "MMBT3904-7-F" 3904-SOT23 47.752,49.657 r0 bottom
Q5 "MMBT3904-7-F" 3904-SOT23 24.956,49.628 r0 bottom
Q6 "MMBT3904-7-F" 3904-SOT23 51.181,40.767 r90 bottom
Q7 "MMBT3904-7-F" 3904-SOT23 43.688,44.958 r90 bottom
Q8 "MMBT3904-7-F" 3904-SOT23 63.246,42.545 r90 bottom
Q9 "6n137" 6n137 58,9.935 r0 bottom
Q10 "MMBT3904-7-F" 3904-SOT23 5.715,29.591 r90 bottom
Q11 "MMBT3904-7-F" 3904-SOT23 16.378,25.206 r90 bottom
Q12 "MMBT3904-7-F" 3904-SOT23 51.878,29.956 r90 bottom
Q13 "MMBT3904-7-F" 3904-SOT23 51.128,34.706 r270 bottom
Q14 "MMBT3904-7-F" 3904-SOT23 40.378,29.956 r90 bottom
Q15 "MMBT3904-7-F" 3904-SOT23 47.117,29.083 r90 bottom
Q16 "MMBT3904-7-F" 3904-SOT23 64.628,24.206 r90 bottom
Q17 "MMBT3904-7-F" 3904-SOT23 94.628,33.206 r90 bottom
R1 "10K" FP-RN73R2A-IPC_A 45.125,73.625 r0 bottom
R2 "332K" FP-RN73R2A-IPC_A 83.625,80.875 r0 bottom
R3 "10.2K" FP-RN73R2A-IPC_A 74.875,86.375 r0 bottom
R4 "0" FP-RN73R2A-IPC_A 74.625,89.125 r90 bottom
R5 "3.24K" FP-RN73R2A-IPC_A 74.625,82.625 r90 bottom
R6 "68.1K" FP-RN73R2A-IPC_A 84.625,77.875 r270 bottom
R7 "10K" FP-RN73R2A-IPC_A 38.125,88.875 r270 bottom
R8 "5.1K" FP-RN73R2A-IPC_A 49.875,97.375 r0 bottom
R9 "5.1K" FP-RN73R2A-IPC_A 53.625,96.875 r90 bottom
R10 "5.1K" FP-RN73R2A-IPC_A 11.375,91.625 r90 bottom
R11 "5.1K" FP-RN73R2A-IPC_A 14.097,67.818 r180 bottom
R12 "5.1K" FP-RN73R2A-IPC_A 12.954,98.298 r270 bottom
R13 "29.4K" FP-RN73R2A-IPC_A 85.625,85.125 r90 bottom
R14 "332K" FP-RN73R2A-IPC_A 87.625,68.375 r270 bottom
R15 "10.2K" FP-RN73R2A-IPC_A 92.202,65.532 r270 bottom
R16 "0" FP-RN73R2A-IPC_A 94.875,64.125 r180 bottom
R17 "1.96K" FP-RN73R2A-IPC_A 90.297,65.913 r270 bottom
R18 "68.1K" FP-RN73R2A-IPC_A 84.582,74.295 r270 bottom
R19 "10K" FP-RN73R2A-IPC_A 26.125,20.125 r270 bottom
R20 "20K" FP-RN73R2A-IPC_A 23.375,3.375 r90 bottom
R21 "20K" FP-RN73R2A-IPC_A 15.875,5.375 r90 bottom
R22 "20K" FP-RN73R2A-IPC_A 15.625,8.125 r0 bottom
R23 "20K" FP-RN73R2A-IPC_A 35.125,7.125 r90 bottom
R24 "20K" FP-RN73R2A-IPC_A 17.375,2.625 r0 bottom
R25 "20K" FP-RN73R2A-IPC_A 30.375,3.125 r0 bottom
R26 "1K" FP-RN73R2A-IPC_A 14.625,11.625 r90 bottom
R27 "1K" FP-RN73R2A-IPC_A 17.875,5.375 r90 bottom
R28 "10K" FP-RN73R2A-IPC_A 12.446,38.481 r0 bottom
R29 "10K" FP-RN73R2A-IPC_A 18.034,38.608 r90 bottom
R30 "100K" FP-RN73R2A-IPC_A 12.7,40.386 r0 bottom
R31 "100K" FP-RN73R2A-IPC_A 17.018,41.529 r0 bottom
R32 "10K" FP-RN73R2A-IPC_A 15.875,43.625 r0 bottom
R33 "10K" FP-RN73R2A-IPC_A 28.875,41.375 r0 bottom
R34 "10K" FP-RN73R2A-IPC_A 29.125,48.125 r0 bottom
R35 "10K" FP-RN73R2A-IPC_A 43.875,51.625 r180 bottom
R36 "10K" FP-RN73R2A-IPC_A 23.625,46.375 r90 bottom
R37 "10K" FP-RN73R2A-IPC_A 47.498,45.974 r90 bottom
R38 "10K" FP-RN73R2A-IPC_A 48.387,42.418 r90 bottom
R39 "10K" FP-RN73R2A-IPC_A 29.375,38.625 r90 bottom
R40 "10K" FP-RN73R2A-IPC_A 60.452,44.45 r270 bottom
R41 "10K" FP-RN73R2A-IPC_A 46.482,40.767 r90 bottom
R42 "100K" FP-RN73R2A-IPC_A 25.875,43.875 r270 bottom
R43 "100K" FP-RN73R2A-IPC_A 51.308,44.323 r180 bottom
R44 "10K" FP-RN73R2A-IPC_A 27.375,38.625 r90 bottom
R45 "10K" FP-RN73R2A-IPC_A 62.738,36.703 r180 bottom
R46 "100K" FP-RN73R2A-IPC_A 25.273,40.259 r90 bottom
R47 "100K" FP-RN73R2A-IPC_A 62.738,38.735 r180 bottom
R48 "10K" FP-RN73R2A-IPC_A 70.104,39.497 r90 bottom
R49 "10K" FP-RN73R2A-IPC_A 86.868,37.846 r180 bottom
R50 "100K" FP-RN73R2A-IPC_A 56.388,44.069 r270 bottom
R51 "100K" FP-RN73R2A-IPC_A 82.169,40.259 r180 bottom
R52 "20K" FP-RN73R2A-IPC_A 14.625,28.375 r180 bottom
R53 "20K" FP-RN73R2A-IPC_A 61.875,23.875 r270 bottom
R54 "20K" FP-RN73R2A-IPC_A 14.625,30.375 r0 bottom
R55 "1K" FP-RN73R2A-IPC_A 10.375,22.375 r180 bottom
R56 "20K" FP-RN73R2A-IPC_A 61.375,21.125 r0 bottom
R57 "1K" FP-RN73R2A-IPC_A 39.116,21.336 r270 bottom
R58 "20K" FP-RN73R2A-IPC_A 35.625,27.625 r0 bottom
R59 "20K" FP-RN73R2A-IPC_A 59.875,28.125 r0 bottom
R60 "20K" FP-RN73R2A-IPC_A 37.625,36.375 r0 bottom
R61 "1K" FP-RN73R2A-IPC_A 34.798,20.828 r270 bottom
R62 "20K" FP-RN73R2A-IPC_A 59.625,30.125 r0 bottom
R63 "1K" FP-RN73R2A-IPC_A 44.831,23.495 r180 bottom
R64 "20K" FP-RN73R2A-IPC_A 18.034,20.066 r270 bottom
R65 "20K" FP-RN73R2A-IPC_A 84.455,32.258 r90 bottom
R66 "20K" FP-RN73R2A-IPC_A 23.375,19.875 r270 bottom
R67 "1K" FP-RN73R2A-IPC_A 52.07,17.399 r270 bottom
R68 "20K" FP-RN73R2A-IPC_A 81.625,31.125 r0 bottom
R69 "1K" FP-RN73R2A-IPC_A 70.866,17.018 r180 bottom
R70 "20K" FP-RN73R2A-IPC_A 34.875,36.625 r90 bottom
R71 "20K" FP-RN73R2A-IPC_A 75.057,20.955 r0 bottom
R72 "20K" FP-RN73R2A-IPC_A 24.875,36.625 r0 bottom
R73 "1K" FP-RN73R2A-IPC_A 58.42,17.653 r270 bottom
R74 "20K" FP-RN73R2A-IPC_A 75.057,18.923 r180 bottom
R75 "1K" FP-RN73R2A-IPC_A 83.375,17.375 r0 bottom
R76 "10K" FP-RN73R2A-IPC_A 12.125,83.625 r180 bottom
R77 "22" FP-RN73R2A-IPC_A 42.625,91.625 r0 bottom
R78 "22" FP-RN73R2A-IPC_A 46.482,92.456 r90 bottom
R79 "29.4K" FP-RN73R2A-IPC_A 96.125,70.875 r270 bottom
R80 "2K" FP-RN73R2A-IPC_A 56.388,66.294 r180 bottom
R81 "10K" FP-RN73R2A-IPC_A 17.272,60.071 r0 bottom
R82 "10K" FP-RN73R2A-IPC_A 20.701,54.737 r180 bottom
R83 "10K" FP-RN73R2A-IPC_A 33.909,60.071 r0 bottom
R84 "10K" FP-RN73R2A-IPC_A 42.672,56.134 r90 bottom
R85 "10K" FP-RN73R2A-IPC_A 47.879,60.833 r180 bottom
R86 "10K" FP-RN73R2A-IPC_A 53.848,60.198 r180 bottom
R87 "10K" FP-RN73R2A-IPC_A 66.802,57.15 r180 bottom
R88 "10K" FP-RN73R2A-IPC_A 72.898,55.118 r90 bottom
R89 "270" 0805-hs 46.736,17.018 r90 bottom
R90 "220" 0805-hs 46.609,8.128 r0 bottom
R91 "1K" 0805-hs 65.428,11.553 r270 bottom
R92 "300" FP-RN73R2A-IPC_A 4.875,33.375 r0 bottom
R93 "300" FP-RN73R2A-IPC_A 28.625,35.875 r0 bottom
R94 "100K" FP-RN73R2A-IPC_A 6.477,25.4 r180 bottom
R95 "100K" FP-RN73R2A-IPC_A 36.875,33.625 r90 bottom
R96 "100K" FP-RN73R2A-IPC_A 10.375,25.375 r0 bottom
R97 "100K" FP-RN73R2A-IPC_A 36.875,22.375 r270 bottom
R98 "300" FP-RN73R2A-IPC_A 55.625,31.125 r180 bottom
R99 "300" FP-RN73R2A-IPC_A 74.625,33.375 r0 bottom
R100 "100K" FP-RN73R2A-IPC_A 54.375,25.375 r0 bottom
R101 "100K" FP-RN73R2A-IPC_A 47.375,37.125 r180 bottom
R102 "100K" FP-RN73R2A-IPC_A 51.625,23.875 r270 bottom
R103 "100K" FP-RN73R2A-IPC_A 48.375,34.625 r270 bottom
R104 "300" FP-RN73R2A-IPC_A 17.272,35.052 r270 bottom
R105 "300" FP-RN73R2A-IPC_A 39.625,33.375 r0 bottom
R106 "100K" FP-RN73R2A-IPC_A 39.878,26.416 r180 bottom
R107 "100K" FP-RN73R2A-IPC_A 48.125,25.125 r270 bottom
R108 "100K" FP-RN73R2A-IPC_A 41.125,23.875 r270 bottom
R109 "100K" FP-RN73R2A-IPC_A 50.875,26.625 r0 bottom
R110 "300" FP-RN73R2A-IPC_A 62.875,33.625 r0 bottom
R111 "300" FP-RN73R2A-IPC_A 86.625,32.625 r90 bottom
R112 "100K" FP-RN73R2A-IPC_A 64.125,20.375 r90 bottom
R113 "100K" FP-RN73R2A-IPC_A 90.375,24.875 r90 bottom
R114 "100K" FP-RN73R2A-IPC_A 71.12,18.923 r0 bottom
R115 "100K" FP-RN73R2A-IPC_A 86.875,27.625 r90 bottom
R116 "6.8K" FP-RN73R2A-IPC_A 94.488,29.845 r0 bottom
R117 "10K" FP-RN73R2A-IPC_A 69.625,78.625 r90 bottom
R118 "10K" FP-RN73R2A-IPC_A 82.125,93.625 r90 bottom
R119 "10K" FP-RN73R2A-IPC_A 59.375,79.125 r90 bottom
R120 "10K" FP-RN73R2A-IPC_A 74.549,92.837 r90 bottom
R121 "10K" FP-RN73R2A-IPC_A 88.375,84.375 r0 bottom
R122 "10K" FP-RN73R2A-IPC_A 63.125,87.375 r0 bottom
R123 "10R" FP-RN73R2A-IPC_A 92.583,23.241 r270 bottom
R124 "27K" FP-RN73R2A-IPC_A 74.625,8.625 r270 bottom
R125 "100K" FP-RN73R2A-IPC_A 68.834,10.16 r180 bottom
R126 "100K" FP-RN73R2A-IPC_A 75.375,2.125 r180 bottom
R127 "470" FP-RN73R2A-IPC_A 77.125,10.375 r90 bottom
R128 "27K" FP-RN73R2A-IPC_A 93.599,14.986 r0 bottom
R129 "100K" FP-RN73R2A-IPC_A 95.504,24.13 r0 bottom
R130 "100K" FP-RN73R2A-IPC_A 92.71,4.572 r90 bottom
R131 "470" FP-RN73R2A-IPC_A 94.125,12.125 r90 bottom
R132 "10K" FP-RN73R2A-IPC_A 61.875,94.375 r270 bottom
R133 "10K" FP-RN73R2A-IPC_A 48.375,83.875 r0 bottom
R134 "10K" FP-RN73R2A-IPC_A 48.375,86.875 r0 bottom
R135 "10K" FP-RN73R2A-IPC_A 50.625,89.625 r90 bottom
R136 "10K" FP-RN73R2A-IPC_A 58.625,93.125 r270 bottom
R137 "10K" FP-RN73R2A-IPC_A 61.375,90.125 r270 bottom
R138 "10K" FP-RN73R2A-IPC_A 50.875,84.625 r90 bottom
R139 "10K" FP-RN73R2A-IPC_A 50.125,82.125 r0 bottom
SW1 "Switch" SWITCH_11MA1QN1 37.766,96.262 r90 bottom
SW2 "Switch" SWITCH_11MA1QN1 13.011,77.979 r0 bottom
SW3 "7101SD9CQE" FP-7101SD9CQE-MFG 32.2,8.5 r0 top
SW4 "TactileButton" SW_1825910-6-4 9,55.5 r0 top
SW5 "TactileButton" SW_1825910-6-4 20.6,55.5 r0 top
SW6 "TactileButton" SW_1825910-6-4 32.2,55.5 r0 top
SW7 "TactileButton" SW_1825910-6-4 43.8,55.5 r0 top
SW8 "TactileButton" SW_1825910-6-4 55.4,55.5 r0 top
SW9 "TactileButton" SW_1825910-6-4 67,55.5 r0 top
SW10 "TactileButton" SW_1825910-6-4 78.6,55.5 r0 top
SW11 "TactileButton" SW_1825910-6-4 90.2,55.5 r0 top
SW12 "TactileButton" KS01_B_12MM 69.469,91.694 r180 top
SW13 "TactileButton" KS01_B_12MM 69.469,75.946 r180 top
tp1 "3.3V" TP 75.912,96.162 r0 bottom value="Test point"
tp2 "3.3V" TP 94.412,66.162 r0 bottom value="Test point"
tp3 "Test point" TP 27.162,2.912 r0 bottom
tp4 "Test point" TP 2.794,10.16 r180 bottom
tp5 "Test point" TP 19.412,66.412 r0 bottom
tp6 "Test point" TP 27.305,60.833 r0 bottom
tp7 "Test point" TP 27.662,5.662 r0 bottom
tp8 "Test point" TP 14.986,33.401 r270 bottom
U1 "AP2112K-3.3TRG1" FP-SOT25-IPC_A 77.408,92.204 r90 bottom

## Footprints (in the part's own frame and the unit in brackets; to place one, negate y for a bottom-side part, rotate by r counter-clockwise, add the part's x,y. Pads: shape width x height; smd on the part's side, far side on the other; paste and mask are expansions set on the pad)
6n137 [mm]
  rect 2.1x1.45 smd: 1(-4.55,3.81) 2(-4.55,1.27) 3(-4.55,-1.27) 4(-4.55,-3.81) 5(4.55,-3.81) 6(4.55,-1.27) 7(4.55,1.27) 8(4.55,3.81)
  silkscreen extent -5.6,-4.84 3.15,4.88
0805-hs [mm]
  rect 1.255x1.556 smd paste+0 mask+0: 1(-1.025,0) 2(1.025,0)
  silkscreen extent -1.65,-1.18 1.65,1.18, body extent -1,-0.63 1,0.63, height 0.6
3904-SOT23 [mm]
  rect 1.659x0.627 smd paste+0 mask+0: 1(-0.977,0.915)
  rrect100% 1.659x0.627 smd paste+0 mask+0: 2(-0.977,-0.915) 3(0.977,0)
  silkscreen extent 0.23,-1.45 0.65,1.45, body extent -1.2,-1.45 1.2,1.45, height 1.1
4148 [mm]
  rect 1.606x0.472 smd paste+0 mask+0: 1(-1.1,0)
  rrect100% 1.606x0.472 smd paste+0 mask+0: 2(1.1,0)
  silkscreen extent -1.76,-0.65 0.85,0.86, body extent -1.25,-0.63 1.25,0.63, height 0.9
CAP_1210 [mm] "1210 (3225 metric) capacitor, pads 1.15x2.7 mm at +/-1.5 mm"
  rect 1.15x2.7 smd: 1(-1.5,0) 2(1.5,0)
CAPC2013X145X48NL20T23 [mm] "0603 (1608 metric), converted from 0805"
  rect 0.8x0.95 smd paste+0 mask+0: 1(-0.825,0) 2(0.825,0)
  silkscreen extent -0.2,-0.62 0.2,0.62
CONN_CCSH-W10R-04TR-BK-A_ADA [mil]
  rect 24x61 smd paste+0 mask+0: 1(-59.06,80.77) 2(-19.68,80.77) 3(19.68,80.77) 4(59.06,80.77)
  rect 47x71 smd paste+0 mask+0: 5(-110.24,-69.82) 6(110.24,-69.82)
  silkscreen extent -234,-102 123,103
D8_N [mm]
  rect 2.474x0.592 smd paste+0 mask+0: 1(-2.416,1.905)
  rrect100% 2.474x0.592 smd paste+0 mask+0: 2(-2.416,0.635) 3(-2.416,-0.635) 4(-2.416,-1.905) 5(2.416,-1.905) 6(2.416,-0.635) 7(2.416,0.635) 8(2.416,1.905)
  silkscreen extent -4.35,-2.45 0.68,2.45, body extent -3,-2.45 3,2.45, height 1.75
D0016A_N [mm] "SOIC, 16-Leads, Body 10x4mm, Pitch 1.27mm, IPC High Density"
  rrect18% 1.25x0.55 smd: 1(-2.625,4.445) 2(-2.625,3.175) 3(-2.625,1.905) 4(-2.625,0.635) 5(-2.625,-0.635) 6(-2.625,-1.905) 7(-2.625,-3.175) 8(-2.625,-4.445) 9(2.625,-4.445) 10(2.625,-3.175) 11(2.625,-1.905) 12(2.625,-0.635) 13(2.625,0.635) 14(2.625,1.905) 15(2.625,3.175) 16(2.625,4.445)
  silkscreen extent -2.75,-5 1.6,5.39, body extent -3,-4.95 3,4.95, height 1.59
DFR0664_TFT_1x10_P2.54_M2 [mm] "DFRobot DFR0664 2.0in TFT: 1x10 header 2.54mm (pin1=VCC), 4x M2 holes 31.7x56mm, board 35.7x60mm. Verify against module before ordering."
  rect 1.7x1.7 hole 1: 1(0,0)
  round 1.7 hole 1: 2(2.54,0) 3(5.08,0) 4(7.62,0) 5(10.16,0) 6(12.7,0) 7(15.24,0) 8(17.78,0) 9(20.32,0) 10(22.86,0)
  round 4 hole 2.2: MH(-4.42,0) MH(-4.42,-56) MH(27.28,0) MH(27.28,-56)
  silkscreen extent -6.42,-58 29.28,2, body extent -6.25,-57.31 29.45,2.7, height 14
EURORACK_PWR_2x5_P2.54_SHROUDED [mm] "Eurorack power header 2x5 2.54mm shrouded, pin1 = -12V (red stripe)"
  rect 1.7x1.7 hole 1: 1(0,0)
  round 1.7 hole 1: 2(0,2.54) 3(2.54,0) 4(2.54,2.54) 5(5.08,0) 6(5.08,2.54) 7(7.62,0) 8(7.62,2.54) 9(10.16,0) 10(10.16,2.54)
  silkscreen extent -6.35,-3.18 15.24,5.72
FP-6_541-5014_01-4-IPC_A [mm]
  rect 1.633x0.572 smd paste+0 mask+0: 1(-1.038,0.95)
  rrect100% 1.633x0.572 smd paste+0 mask+0: 2(-1.038,-0.95) 3(1.038,0)
  silkscreen extent -0.66,-1.48 0.66,1.48, body extent -1.24,-1.48 1.24,1.48, height 1.15
FP-7101SD9CQE-MFG [mm]
  oval 2.7x1.7 hole 0.9 square: 1(0,2.54) 2(0,0) 3(0,-2.54)
  silkscreen extent -2.66,-4.19 2.64,4.11
FP-216990-0002-MFG [mm]
  rrect100% 1x1.8 hole 1.4 slot 0.6 at 0 deg paste-2539.97 mask+0: 1(-5.62,2.85) 2(5.62,2.85)
  rrect100% 1x2.2 hole 1.8 slot 0.6 at 0 deg paste-2539.97 mask+0: 3(-5.62,-1.15) 4(5.62,-1.15)
  rect 0.6x1.1 smd paste+0 mask+0: A1-B12(-3.2,4) A4-B9(-2.4,4) B1-A12(3.2,4) B4-A9(2.4,4)
  rect 0.3x1.1 smd paste+0 mask+0: A5(-1.25,4) A6(-0.25,4) A7(0.25,4) A8(1.25,4) B5(1.75,4) B6(0.75,4) B7(-0.75,4) B8(-1.75,4)
  silkscreen extent -4.57,3.9 4.57,5.25, body extent -5.77,-3.25 5.77,3.95, height 2.36
FP-D0014A-IPC_B [mm] "SOIC, 14-Leads, Body 8.75x4mm, Pitch 1.27mm, IPC Low Density"
  rrect15% 1.65x0.65 smd: 1(-2.825,3.81) 2(-2.825,2.54) 3(-2.825,1.27) 4(-2.825,0) 5(-2.825,-1.27) 6(-2.825,-2.54) 7(-2.825,-3.81) 8(2.825,-3.81) 9(2.825,-2.54) 10(2.825,-1.27) 11(2.825,0) 12(2.825,1.27) 13(2.825,2.54) 14(2.825,3.81)
  silkscreen extent -2.95,-4.38 1.6,4.81, body extent -3.02,-4.32 3.02,4.32, height 1.59
FP-PEC16-4115F-S0012-MFG [mm]
  rrect100% 2.6x4.7 hole 4.1 slot 2 at 0 deg paste-2539.97 mask+0: 1(-7.4,2.1) 2(7.4,2.1)
  rect 1.85x1.85 hole 1.2 paste-2539.97 mask+0: A(-5,-8.4)
  round 1.85 hole 1.2 paste-2539.97 mask+0: B(0,-8.4) C(5,-8.4) D(-2.5,9.1) E(2.5,9.1)
  silkscreen extent -8,-11.35 8,10.4, body extent -8.8,-10.5 8.8,10.5, height 0.25
FP-RN73R2A-IPC_A [mm] "0603 (1608 metric), converted from 0805"
  rect 0.8x0.95 smd paste+0 mask+0: 1(-0.825,0) 2(0.825,0)
  silkscreen extent -0.2,-0.62 0.2,0.62
FP-SMA-MFG [mm]
  rect 2.5x1.7 smd paste+0 mask+0: 1(-2,0) 2(2,0)
  silkscreen extent -3.93,-1.46 2.3,1.46, body extent -2.6,-1.3 2.6,1.3, height 2.4
FP-SOT25-IPC_A [mm]
  rect 1.707x0.616 smd paste+0 mask+0: 1(-1.201,0.95)
  rrect100% 1.707x0.616 smd paste+0 mask+0: 2(-1.201,0) 3(-1.201,-0.95) 4(1.201,-0.95) 5(1.201,0.95)
  silkscreen extent -3.08,-1.75 1.4,1.75, body extent -1.4,-1.47 1.4,1.45, height 1.45
FP-SOT109-1-MFG [mm]
  rect 2.204x0.608 smd paste+0 mask+0: 1(-2.551,4.445)
  rrect100% 2.204x0.608 smd paste+0 mask+0: 2(-2.551,3.175) 3(-2.551,1.905) 4(-2.551,0.635) 5(-2.551,-0.635) 6(-2.551,-1.905) 7(-2.551,-3.175) 8(-2.551,-4.445) 9(2.551,-4.445) 10(2.551,-3.175) 11(2.551,-1.905) 12(2.551,-0.635) 13(2.551,0.635) 14(2.551,1.905) 15(2.551,3.175) 16(2.551,4.445)
  silkscreen extent -4.73,-4.95 0.95,4.95, body extent -3,-4.95 3,4.95, height 1.75
HDR_1x2_P2.54 [mm] "Pin header 1x2, 2.54 mm"
  rect 1.7x1.7 hole 1: 1(0,0)
  round 1.7 hole 1: 2(2.54,0)
HDR_1x3_P2.54 [mm] "Pin header 1x3, 2.54 mm"
  rect 1.7x1.7 hole 1: 1(0,0)
  round 1.7 hole 1: 2(2.54,0) 3(5.08,0)
IND_SRN6045 [mm] "6x6 mm shielded power inductor (Bourns SRN6045), pads 1.8x5.1 mm, 6.5 mm overall"
  rect 1.8x5.1 smd: 1(-2.35,0) 2(2.35,0)
KS01_B_12MM [mm] "Highly Electric KS01-B (no LED) 12 mm round tact switch, 4x 1.0 mm holes on 5.0x5.0 mm grid; 1-2 common, 3-4 common"
  rect 1.498x1.498 / inner round 1.498 / far side rect 1.498x1.498 hole 0.99 mask+0.102: 1(-2.5,2.5)
  round 1.498 hole 0.99 mask+0.102: 2(2.5,2.5) 3(-2.5,-2.5) 4(2.5,-2.5)
  silkscreen extent -4.54,-3 3,3, body extent -3.77,-2.94 4.03,3.05, height 5.08
LED_0805 [mm] "0805 SMD LED, pad 1 = anode, pad 2 = cathode"
  rect 1.255x1.556 smd paste+0 mask+0: 1(-1.025,0) 2(1.025,0)
  silkscreen extent -1.65,-1.18 1.65,1.18, body extent -1,-0.63 1,0.63, height 0.6
LED_SSL-LX4673GD-LA20 [mm]
  rect 1.358x1.358 / inner round 1.358 / far side rect 1.358x1.358 hole 0.85 mask+0.102: 1(-1.27,0)
  round 1.358 hole 0.85 mask+0.102: 2(1.27,0)
  silkscreen extent -3.08,-1.83 3.08,1.83
MF03A_L [mm] "SOT23, 3-Leads, Body 2.9x1.3mm, Pitch 0.95mm, Lead Span 2.4mm, IPC Medium Density"
  rect 1.3x0.6 smd: 1(-1.05,0.95) 2(-1.05,-0.95) 3(1.05,0)
  silkscreen extent -1.17,-1.5 0.7,1.92, body extent -0.7,-1.52 0.7,1.52, height 1.12
SOP50P490X110-10N [mm]
  rect 1.4x0.3 smd: 1(-2.2,1) 2(-2.2,0.5) 3(-2.2,0) 4(-2.2,-0.5) 5(-2.2,-1) 6(2.2,-1) 7(2.2,-0.5) 8(2.2,0) 9(2.2,0.5) 10(2.2,1)
  silkscreen extent -2.9,-1.5 1.15,1.5
SOP65P640X120-14N [mm]
  rect 1.475x0.45 smd: 1(-2.938,1.95) 2(-2.938,1.3) 3(-2.938,0.65) 4(-2.938,0) 5(-2.938,-0.65) 6(-2.938,-1.3) 7(-2.938,-1.95) 8(2.938,-1.95) 9(2.938,-1.3) 10(2.938,-0.65) 11(2.938,0) 12(2.938,0.65) 13(2.938,1.3) 14(2.938,1.95)
  silkscreen extent -3.67,-2.5 1.85,2.52
SW_1825910-6-4 [mm]
  rect 1.498x1.498 / inner round 1.498 / far side rect 1.498x1.498 hole 0.99 mask+0.102: 1(-3.25,2.25)
  round 1.498 hole 0.99 mask+0.102: 2(3.25,2.25) 3(-3.25,-2.25) 4(3.25,-2.25)
  silkscreen extent -4.54,-3 3,3, body extent -3.77,-2.94 4.03,3.05, height 5.08
SWITCH_11MA1QN1 [mil]
  round 52 hole 32 mask+4.02: 1(0,0) 2(79,0) 3(157,0)
  round 79 hole 59 mask+4.02: B1(-83,0) B2(240,0)
  silkscreen extent -95,-100 250,100, body extent -85,-239 254,92, height 185
THONK_PJ366ST_MIDI_TRS [mm] "Stereo Thonkiconn (QingPu WQP-PJ366ST / WQP419GR) for MIDI TRS Type A: pad 5 = tip, 4 = ring, 2 = sleeve"
  oval 2.216x1.108 hole 0.6 square: 2(0,-6.48) 4(0,-3.38)
  oval 2.016x1.008 hole 0.5 square: 5(0,4.92)
  Keep-Out Layer region: 2.8,-2.8 -2.8,-2.8 -2.8,2.8 2.8,2.8
  silkscreen extent -4.5,-7.65 4.5,6, body extent -4.5,-7.55 4.5,6, height 14.5
THONK_PJ398SM-12 [mm]
  oval 2.216x1.108 hole 0.6 square: 1(0,-6.48) 2(0,-3.38)
  oval 2.016x1.008 hole 0.5 square: 3(0,4.92)
  Keep-Out Layer region: 2.8,-2.8 -2.8,-2.8 -2.8,2.8 2.8,2.8
  silkscreen extent -4.5,-7.65 4.5,6, body extent -4.5,-7.55 4.5,6, height 14.5
tl072 [mm]
  rect 2.474x0.592 smd paste+0 mask+0: 1(-2.416,1.905)
  rrect100% 2.474x0.592 smd paste+0 mask+0: 2(-2.416,0.635) 3(-2.416,-0.635) 4(-2.416,-1.905) 5(2.416,-1.905) 6(2.416,-0.635) 7(2.416,0.635) 8(2.416,1.905)
  silkscreen extent -4.35,-2.45 0.68,2.45, body extent -3,-2.45 3,2.45, height 1.75
tl074 [mm] "SOIC, 14-Leads, Body 8.75x4mm, Pitch 1.27mm, IPC Low Density"
  rrect15% 1.65x0.65 smd: 1(-2.825,3.81) 2(-2.825,2.54) 3(-2.825,1.27) 4(-2.825,0) 5(-2.825,-1.27) 6(-2.825,-2.54) 7(-2.825,-3.81) 8(2.825,-3.81) 9(2.825,-2.54) 10(2.825,-1.27) 11(2.825,0) 12(2.825,1.27) 13(2.825,2.54) 14(2.825,3.81)
  silkscreen extent -2.95,-4.38 1.6,4.81, body extent -3.02,-4.32 3.02,4.32, height 1.59
TP [mil]
  round 60 hole 30: 1(0,0)
WCAP-ASLI_D4H5.5 [mm] "Aluminium Electrolytic V-Chip SMT Capacitors, 4x5.5mm"
  rect 2.6x1.6 smd: 1(1.8,0) 2(-1.8,0)
  silkscreen extent -2.25,-2.25 2.25,2.25, body extent -2.5,-2.15 2.5,2.15, height 5.5
XCVR_ESP32-S3-WROOM-1-N16R2 [mm]
  rect 1.5x0.9 smd: 2(-8.75,3.99) 3(-8.75,2.72) 4(-8.75,1.45) 5(-8.75,0.18) 6(-8.75,-1.09) 7(-8.75,-2.36) 8(-8.75,-3.63) 9(-8.75,-4.9) 10(-8.75,-6.17) 11(-8.75,-7.44) 12(-8.75,-8.71) 13(-8.75,-9.98) 14(-8.75,-11.25) 27(8.75,-11.25) 28(8.75,-9.98) 29(8.75,-8.71) 30(8.75,-7.44) 31(8.75,-6.17) 32(8.75,-4.9) 33(8.75,-3.63) 34(8.75,-2.36) 35(8.75,-1.09) 36(8.75,0.18) 37(8.75,1.45) 38(8.75,2.72) 39(8.75,3.99) GND(-8.75,5.26) GND(8.75,5.26)
  rect 0.9x1.5 smd: 15(-6.985,-12.5) 16(-5.715,-12.5) 17(-4.445,-12.5) 18(-3.175,-12.5) 19(-1.905,-12.5) 20(-0.635,-12.5) 21(0.635,-12.5) 22(1.905,-12.5) 23(3.175,-12.5) 24(4.445,-12.5) 25(5.715,-12.5) 26(6.985,-12.5)
  round 0.4 hole 0.2 mask+0: 41_10(-1.5,-1.76) 41_11(-2.9,-1.76) 41_12(-0.1,-1.76) 41_13(-2.9,-3.16) 41_14(-1.5,-3.16) 41_15(-0.1,-3.16) 41_16(-2.2,-1.06) 41_17(-0.8,-1.06) 41_18(-2.2,-2.46) 41_19(-0.8,-2.46) 41_20(-2.2,-3.86) 41_21(-0.8,-3.86)
  rect 0.9x0.9 smd: GND(-2.9,-3.86) GND(-2.9,-2.46) GND(-2.9,-1.06) GND(-1.5,-3.86) GND(-1.5,-2.46) GND(-1.5,-1.06) GND(-0.1,-3.86) GND(-0.1,-2.46) GND(-0.1,-1.06)
  Keep-Out Layer region: 9,6.75 -9,6.75 -9,12.75 9,12.75
  Keep-Out Layer region: 9,6.75 -9,6.75 -9,12.75 9,12.75
  silkscreen extent -10.3,-12.75 9,12.75, body extent -9,-12.75 9,12.75, height 3.25